# Altium PCB PCB-MAIN.PcbDoc (part 4 of 6)
Units mm, origin at the board's own origin, x right, y up, seen from the top; angles counter-clockwise.
Board outline 110 x 75 mm, 8 copper layers (F.Cu, In1.Cu, In2.Cu, In3.Cu, In4.Cu, In5.Cu, In6.Cu, B.Cu); 251 components, 185 nets, 1143 pads, 853 vias.
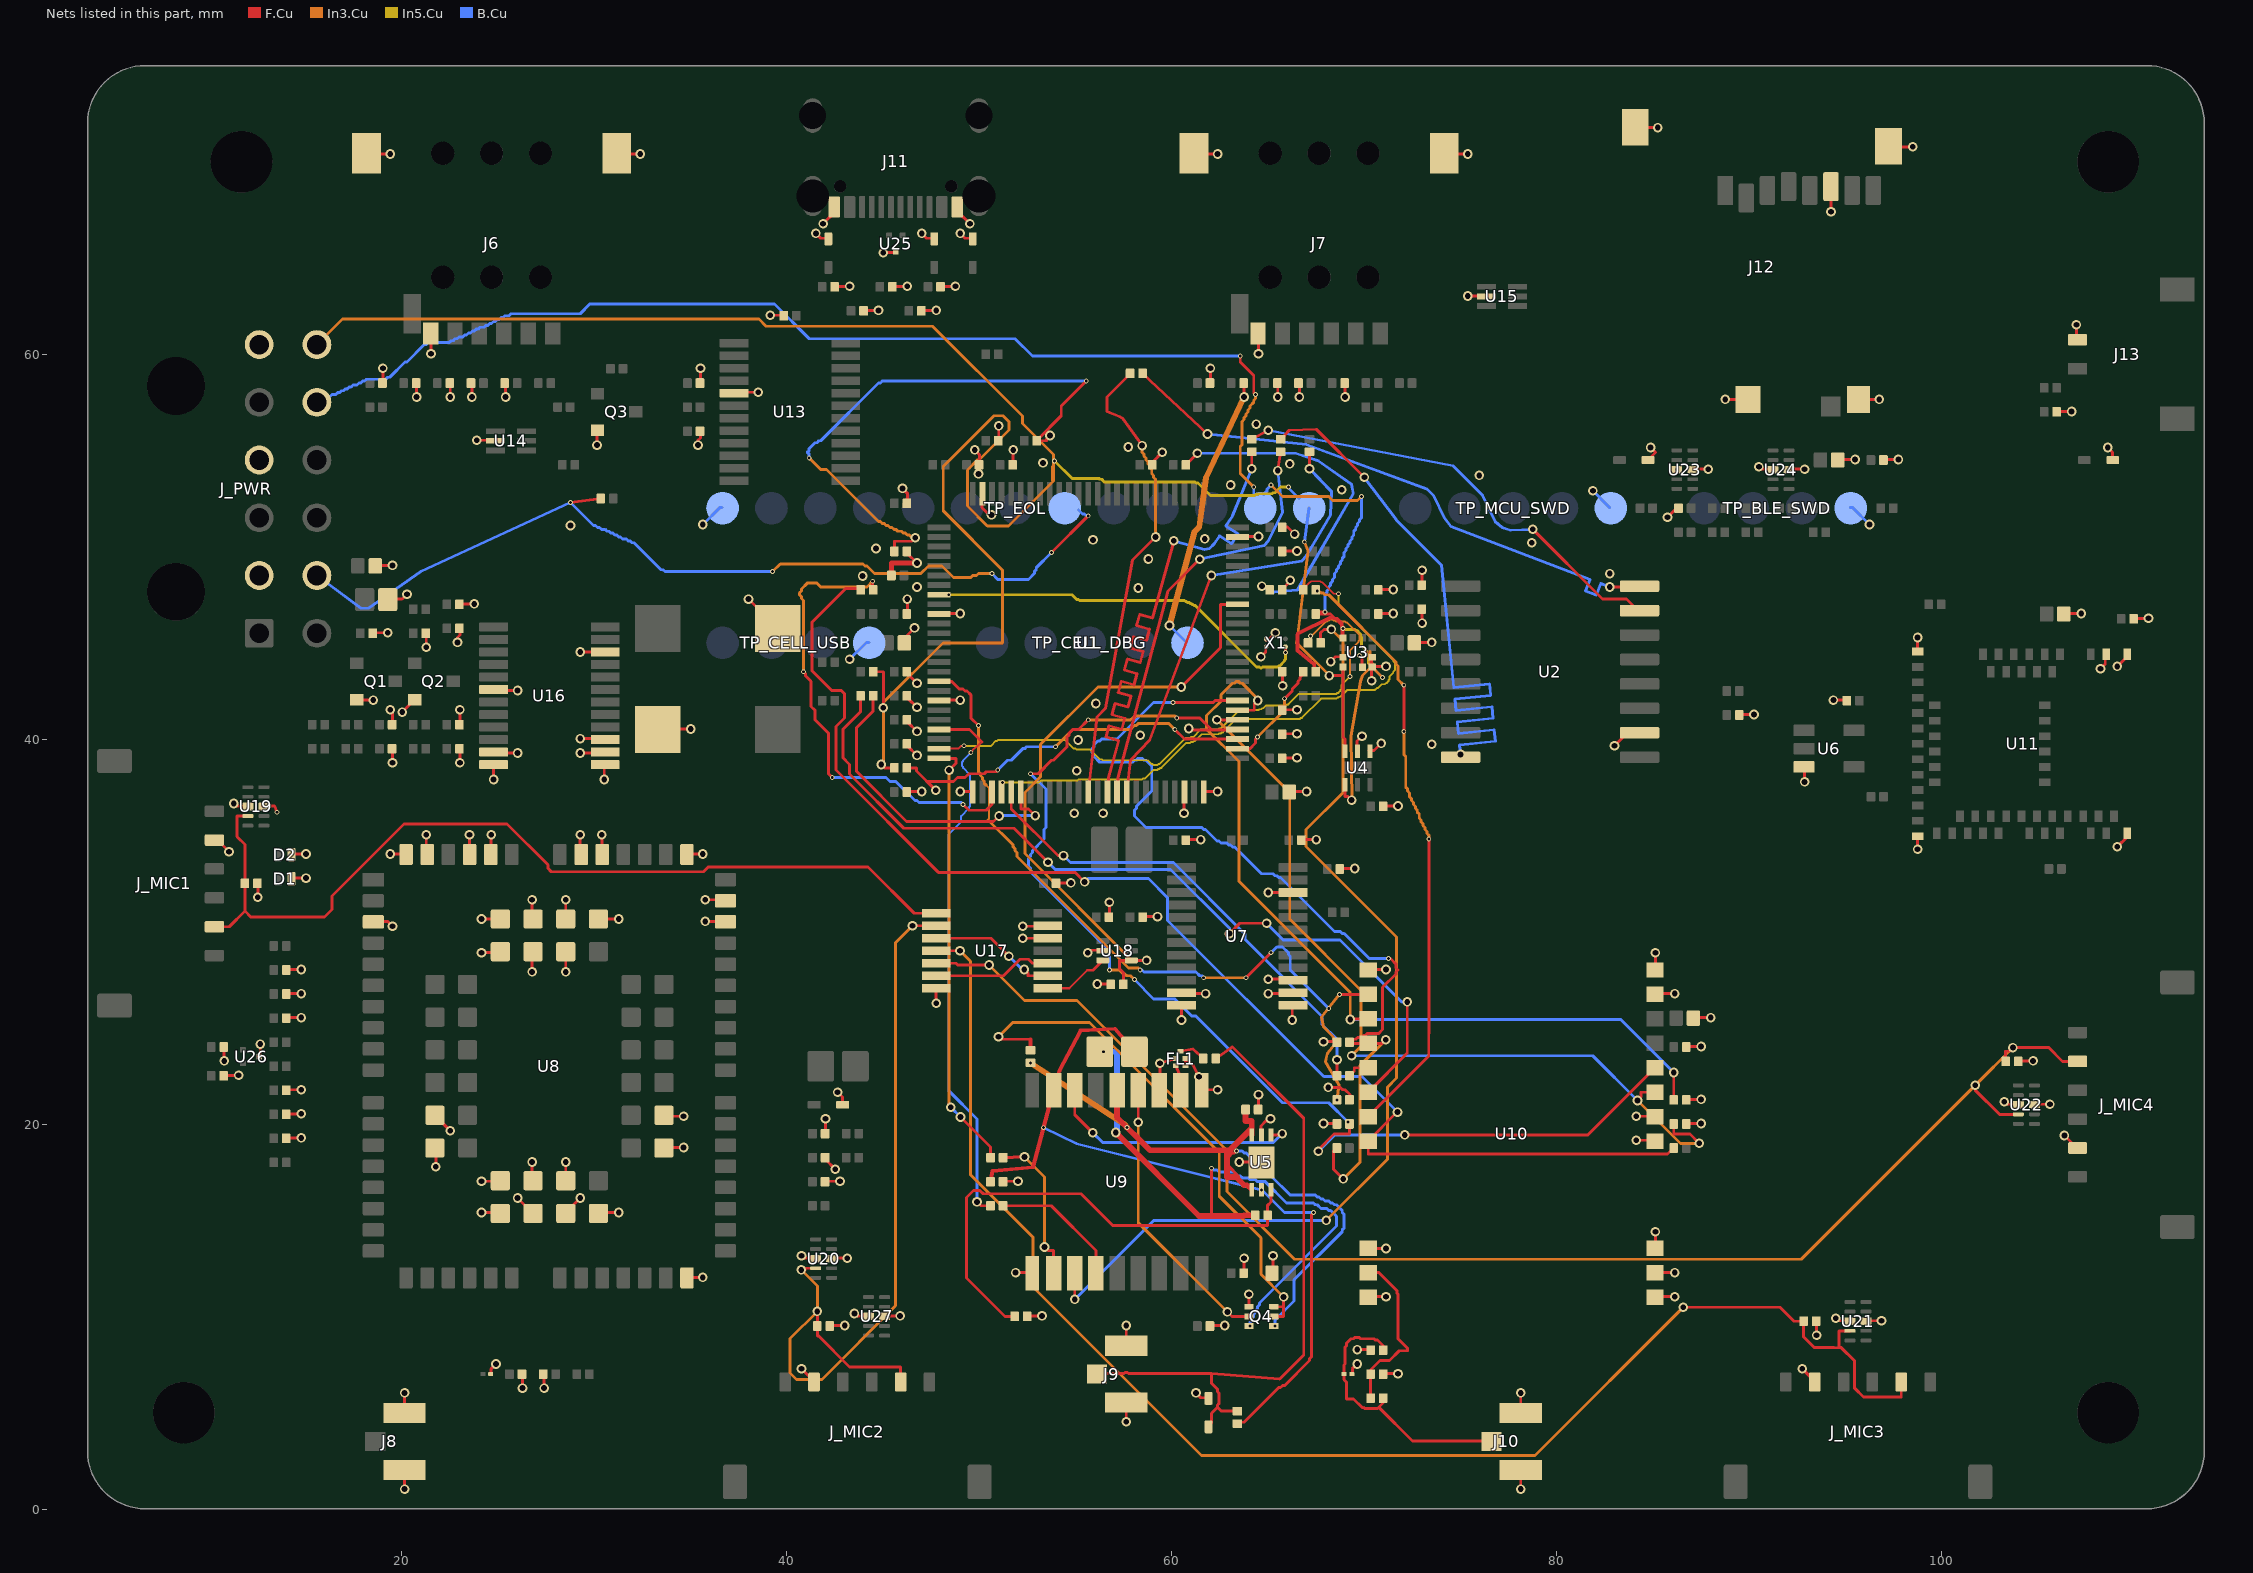
[diagram p9: the nets of this part, all layers, seen from the top]

## Via types
v1: diameter 0.5, hole 0.3, F.Cu to B.Cu, tented both sides, 579 vias
v2: diameter 0.25, hole 0.15, F.Cu to B.Cu, tented both sides, 274 vias

## Nets (pads, with @x,y where several pads share a name; then routed paths per layer and width w, separated by ;. In a path a pad name is that pad's centre, name@x,y a point inside that pad or via, vN(x,y) a via of type N, cw(c..) or ccw(c..) an arc to the next point about the centre after c; other vN are vias at no path point) (continued)
FAULT: J_PWR.8 R103.1 TP_EOL.8 | length 48.2
  F.Cu w0.15: v2(28.785,52.325) R103.1@30.36,52.525 ; v2(53.785,49.725) v2(55.685,51.625)
  In3.Cu w0.15: v2(39.285,48.725) 39.685,49.125 43.985,49.125 44.085,49.025 44.185,49.025 44.585,48.625 46.985,48.625 47.385,49.025 48.085,49.025 48.685,48.425 49.585,48.425 49.685,48.525 49.885,48.525 49.985,48.625 v2(50.685,48.625)
  B.Cu w0.15: J_PWR.8@15.605,48.525 17.885,46.825 18.285,46.825 20.985,48.725 v2(28.785,52.325) 29.985,51.125 30.085,51.125 30.185,51.025 30.285,51.025 30.385,50.925 30.585,50.925 30.685,50.825 30.785,50.825 30.885,50.725 30.985,50.725 31.085,50.625 31.185,50.625 31.285,50.525 31.385,50.525 31.485,50.425 31.685,50.425 31.785,50.325 31.885,50.325 31.985,50.225 32.085,50.225 33.485,48.825 33.585,48.825 33.685,48.725 v2(39.285,48.725) ; v2(50.685,48.625) 50.985,48.325 52.585,48.325 52.885,48.625 52.885,48.725 52.985,48.825 52.985,48.925 v2(53.785,49.725) ; TP_EOL.8@55.185,51.925 55.385,51.725 55.485,51.725 55.585,51.625 v2(55.685,51.625)
GND_DIGITAL: C1.2 C2.2 C3.2 C4.2 C5.2 C6.2 C7.2 C8.2 C9.2 C10.2 C11.2 C12.2 C13.2 C14.2 C15.2 C16.2 C17.2 C18.2 C19.2 C21.2 C22.2 C23.2 C24.2 C25.2 C26.2 C27.2 C28.2 C29.2 C31.2 C32.2 C60.2 C61.2 C62.2 C63.2 C65.2 C66.2 C67.2 C68.2 C69.2 C70.2 C71.2 C72.2 C73.2 C74.2 C75.2 C76.2 C77.2 C78.2 D4.2 D5.2 D6.2 D7.2 D8.2 D9.2 D11.2 FL1.B FL1.D FL1.E J9.SHIELD J10.SHIELD J11.A1 J11.A12 J11.B1 J11.B12 J12.6 J12.SHIELD J13.2 J_PWR.4 Q4.1 R2.2 R3.2 R5.2 R23.2 R60.2 R63.2 R64.2 R65.2 R66.2 R77.2 R93.2 R94.2 R96.2 R97.2 R98.2 TP_BLE_SWD.4 TP_EOL.1 TP_MCU_SWD.5 U1.10 U1.19 U1.26 U1.48 U1.50 U1.74 U1.99 U2.10 U3.3 U3.6 U3.7 U3.8 U4.4 U4.5 U5.5 U5.EP U6.3 U7.11 U7.12 U7.13 U7.14 U7.15 U7.22 U9.1 U9.10 U9.12 U10.1 U10.2 U10.3 U10.4 U10.5 U10.10 U10.11 U10.12 U10.20 U10.22 U11.1 U11.2 U11.15 U11.33 U11.55 U18.2 U23.3 U23.8 U24.3 U24.8 U25.3 X1.1 X1.4 | length 121.2
  F.Cu w0.15: C19.2@19.285,47.3 20.035,47.3 v1(20.285,47.55) ; v1(41.535,66.3) 41.785,66.05 D8.2@42.16,66.05 ; v1(41.91,66.8) 42.535,67.425 J11.B1@42.535,67.675 ; R94.2@42.535,63.55 v1(43.285,63.55) ; R98.2@44.035,62.3 v1(44.785,62.3) ; v1(45.035,65.3) U25.3@45.66,65.3 ; C77.2@45.535,63.55 v1(46.285,63.55) ; v1(46.035,53.05) 46.285,52.8 R96.2@46.285,52.3 ; C6.2@46.16,45.05 46.16,45.3 v1(46.66,45.8) ; C2.2@46.285,37.3 v1(47.035,37.3) ; C10.2@46.285,39.8 46.285,39.675 v1(46.785,39.175) ; C8.2@46.285,41.05 46.285,40.925 v1(46.785,40.425) ; C9.2@46.285,42.3 46.285,42.175 v1(46.785,41.675) ; C11.2@46.285,43.55 46.285,43.425 v1(46.785,42.925) ; C1.2@46.285,46.55 v1(46.285,47.3) ; R5.2@46.285,49.8 46.285,49.675 v1(46.785,49.175) ; R97.2@47.035,62.3 v1(47.785,62.3) ; v1(47.035,66.3) 47.285,66.05 D7.2@47.66,66.05 ; U1.19@47.91,42.05 v1(49.035,42.05) ; U1.10@47.91,46.55 v1(49.035,46.55) ; R93.2@48.035,63.55 v1(48.785,63.55) ; J11.B12@48.91,67.675 48.91,67.425 v1(49.535,66.8) ; v1(49.035,37.3) U1.26@49.66,37.3 ; v1(49.035,66.3) 49.285,66.05 D6.2@49.66,66.05 ; v1(49.785,55.05) 50.035,54.8 C5.2@50.035,54.3 ; U1.99@50.16,52.8 50.16,52.05 50.41,51.8 50.535,51.8 v1(50.66,51.675) ; C17.2@51.035,55.55 v1(51.035,56.3) ; C63.2@51.285,17.05 v1(52.035,17.05) ; C15.2@51.785,54.3 v1(51.785,55.05) ; v1(51.91,12.3) U9.1@52.785,12.3 ; R60.2@52.535,10.05 v1(53.285,10.05) ; v1(55.66,28.925) 55.785,29.05 U18.2@56.41,29.05 ; v1(56.16,27.3) R23.2@56.91,27.3 ; C31.2@56.785,30.8 v1(56.785,31.55) ; v1(57.66,4.55) J9.SHIELD@57.66,5.55 ; J9.SHIELD@57.66,8.55 v1(57.66,9.55) ; C32.2@58.535,30.8 v1(59.285,30.8) ; C18.2@59.035,54.3 59.035,54.425 v1(59.535,54.925) ; U9.12@59.41,21.8 v1(59.41,23.175) FL1.B@60.235,23.425 ; v1(60.535,25.425) U7.12@60.535,26.175 ; U7.11@60.535,26.8 v1(61.785,26.8) ; v1(60.66,36.175) U1.48@60.66,37.3 ; FL1.E@60.735,23.05 FL1.D@60.735,23.425 61.135,23.075 v1(61.435,22.475) ; C27.2@60.785,34.8 v1(61.535,34.8) ; v1(61.285,6.05) 61.535,5.8 D4.2@61.91,5.8 ; U9.10@61.535,21.8 v1(62.41,21.8) ; U1.50@61.66,37.3 v1(62.41,37.3) ; C62.2@62.035,9.55 v1(62.785,9.55) ; U1.74@63.41,50.55 v1(64.535,50.55) ; v1(63.535,18.05) U5.EP@64.66,18.05 ; C60.2@63.785,12.3 v1(63.785,13.05) ; Q4.1@64.035,10.55 v1(64.035,11.175) ; C65.2@64.535,20.8 v1(64.535,21.55) ; U5.5@64.66,19.425 64.66,19.925 64.91,20.175 65.035,20.175 v1(65.16,20.3) ; v1(64.66,44.3) 64.91,44.55 X1.1@64.91,44.8 ; X1.4@64.91,45.175 65.035,45.175 v1(65.41,45.55) ; v1(65.035,26.8) U7.14@66.285,26.8 ; v1(65.035,27.55) U7.15@66.285,27.55 ; v1(65.035,32.05) U7.22@66.285,32.05 ; C61.2@65.285,12.3 v1(65.285,13.175) ; C3.2@65.785,39.05 v1(66.535,39.05) ; C14.2@65.785,40.3 v1(66.535,40.3) ; C16.2@65.785,41.55 v1(66.535,41.55) ; v1(65.785,42.8) R2.2@65.785,43.55 ; R3.2@65.785,47.8 v1(66.185,48.275) ; C12.2@65.785,49.8 v1(66.535,49.8) ; C4.2@65.785,51.05 66.035,51.05 v1(66.41,50.675) ; C13.2@66.16,37.3 v1(67.035,37.3) ; v1(66.285,25.425) U7.13@66.285,26.175 ; C28.2@66.785,34.8 v1(67.535,34.8) ; v1(67.91,20.05) R63.2@68.66,20.05 ; v1(67.91,24.3) C68.2@68.66,24.3 ; v1(68.16,21.925) 68.785,21.925 68.91,21.8 69.035,21.8 69.285,21.55 R65.2@69.285,21.3 ; v1(68.285,44.05) 68.535,44.3 U3.3@68.91,44.3 ; C29.2@68.785,33.3 v1(69.535,33.3) ; D5.2@69.41,7.05 69.41,7.3 v1(69.66,7.55) ; v1(69.66,8.3) C70.2@70.41,8.3 ; U4.5@69.66,39.425 69.66,39.925 v1(69.91,40.175) ; v2(69.785,44.375) 69.91,44.3 U3.6@69.91,43.8 ; U10.22@70.285,11.05 v1(71.16,11.05) ; U10.20@70.285,13.55 v1(71.16,13.55) ; U10.12@70.285,28.05 v1(71.16,28.05) ; U4.4@70.285,39.425 70.535,39.425 v1(70.91,39.8) ; v1(70.41,43.05) U3.8@70.41,44.3 ; U3.7@70.41,43.8 v1(71.16,43.8) ; C23.2@70.785,46.55 v1(71.535,46.55) ; C25.2@70.785,47.8 v1(71.535,47.8) ; C69.2@71.035,7.05 v1(71.785,7.05) ; C26.2@71.035,36.55 v1(71.785,36.55) ; C24.2@72.66,45.05 v1(73.535,45.05) ; v1(73.035,46.05) C21.2@73.035,46.8 ; C22.2@73.035,48.05 v1(73.035,48.8) ; v1(78.16,1.05) J10.SHIELD@78.16,2.05 ; J10.SHIELD@78.16,5.05 v1(78.16,6.05) ; v1(83.035,39.675) 83.66,40.3 U2.10@84.285,40.3 ; v1(84.16,19.175) U10.4@85.16,19.175 ; v1(84.16,20.425) U10.5@85.16,20.425 ; J12.SHIELD@84.16,71.8 v1(85.285,71.8) ; D11.2@84.775,54.525 85.16,54.925 v1(84.91,55.175) ; U10.1@85.16,11.05 v1(86.16,11.05) ; U10.2@85.16,12.3 v1(86.16,12.3) ; U10.3@85.16,13.55 v1(85.16,14.425) ; U10.10@85.16,26.8 v1(86.16,26.8) ; U10.11@85.16,28.05 v1(85.16,28.925) ; v1(85.785,51.55) 86.285,52.05 C76.2@86.41,52.05 ; R64.2@86.785,20.05 v1(87.535,20.05) ; R66.2@86.785,21.3 v1(87.535,21.3) ; C66.2@86.785,24.05 v1(87.535,24.05) ; C67.2@87.16,25.55 v1(88.035,25.55) ; U23.8@87.16,54.05 v1(87.91,54.05) ; v1(88.785,57.675) J12.SHIELD@89.91,57.675 ; R77.2@89.535,41.3 v1(90.285,41.3) ; v1(90.535,54.175) 90.66,54.05 U24.3@91.285,54.05 ; U24.8@92.16,54.05 v1(92.91,54.05) ; v1(92.91,37.8) U6.3@92.91,38.55 ; v1(94.285,67.425) J12.6@94.285,68.675 ; v1(94.41,42.05) C73.2@95.16,42.05 ; C75.2@94.66,54.55 v1(95.535,54.55) ; J12.SHIELD@95.66,57.675 v1(96.785,57.675) ; C74.2@97.035,54.55 v1(97.785,54.55) ; J12.SHIELD@97.285,70.8 v1(98.535,70.8) ; v1(98.785,34.3) U11.33@98.785,34.925 ; U11.15@98.785,44.55 v1(98.785,45.3) ; C78.2@106.035,57.05 v1(106.785,57.05) ; C72.2@106.41,46.55 v1(107.285,46.55) ; J13.2@107.035,60.8 v1(107.035,61.55) ; v1(108.285,43.675) 108.535,43.925 U11.2@108.535,44.425 ; v1(108.66,55.175) 108.91,54.925 D9.2@108.91,54.55 ; v1(109.16,34.425) 109.66,34.925 U11.55@109.66,35.175 ; v1(109.16,43.8) 109.66,44.3 U11.1@109.66,44.425 ; C71.2@110.035,46.3 v1(110.785,46.3)
  F.Cu w0.25: C7.2@45.46,48.525 45.46,49.175 v1(46.785,49.175)
  B.Cu w0.15: v1(35.66,51.175) 36.535,52.05 TP_EOL.1@36.66,52.05 ; v1(81.91,52.925) TP_MCU_SWD.5@82.785,52.05 ; TP_BLE_SWD.4@95.285,52.05 95.41,52.05 v1(96.285,51.175)
  other v1: 54.96,36.175 56.46,36.175 55.085,38.375 73.535,39.75 55.16,39.975 58.385,40.225 56.085,41.875 58.285,47.875 46.785,47.925 43.96,48.5 82.785,48.625 58.814,49.384 44.66,49.925 78.735,50.225 55.935,50.375 61.735,50.425 28.785,51.125 68.86,52.975 63.085,53.225 76.001,53.725 49.985,53.805 66.16,54.325 53.335,54.375 57.76,55.2 64.411,56.392
  other v2: 86.267,54.025
GND_MIC: C20.2 C30.2 J_MIC1.2 J_MIC2.2 J_MIC3.2 J_MIC4.2 J_PWR.6 R19.2 R20.2 R21.2 R22.2 U17.7 U17.12 U17.13 U19.3 U19.8 U20.3 U20.8 U21.3 U21.8 U22.3 U22.8 | length 17.8
  F.Cu w0.15: J_MIC1.2@10.285,34.8 10.41,34.8 v1(11.035,34.175) ; v1(11.285,36.675) 11.41,36.55 U19.3@12.035,36.55 ; v1(12.535,31.8) R19.2@12.535,32.55 ; U19.8@12.91,36.55 13.41,36.55 v2(13.535,36.225) ; C20.2@18.66,49.05 v1(19.535,49.05) ; v1(40.785,7.3) J_MIC2.2@41.41,6.675 ; v1(40.785,13.175) 40.91,13.05 U20.3@41.535,13.05 ; R20.2@42.285,9.55 v1(43.035,9.55) ; U20.8@42.41,13.05 v1(43.16,13.05) ; v1(47.785,26.3) U17.7@47.785,27.05 ; v1(52.285,29.675) U17.12@53.535,29.675 ; v1(52.285,30.3) U17.13@53.535,30.3 ; C30.2@54.035,32.55 v1(54.785,32.55) ; v1(92.785,7.3) J_MIC3.2@93.41,6.675 ; v1(93.535,9.05) R21.2@93.535,9.8 ; v1(94.535,9.925) 94.66,9.8 U21.3@95.285,9.8 ; U21.8@96.16,9.8 v1(96.91,9.8) ; v1(103.285,21.175) 103.41,21.05 U22.3@104.035,21.05 ; R22.2@104.035,23.3 v1(104.785,23.3) ; U22.8@104.91,21.05 v1(105.66,21.05) ; v1(106.41,19.425) J_MIC4.2@107.035,18.8
GND_MODEM: C33.2 C34.2 C35.2 C36.2 C37.2 C38.2 C39.2 C40.2 C41.2 C42.2 C43.2 C44.2 C45.2 C46.2 C47.2 C48.2 C49.2 C50.2 C51.2 C52.2 C53.2 C54.2 C55.2 C56.2 C57.2 C58.2 C59.2 C79.2 C80.2 D1.2 D2.2 D3.2 D10.2 J6.4 J6.SHIELD J7.4 J7.SHIELD J8.SHIELD J_PWR.2 Q1.2 Q2.2 Q3.2 R25.2 R27.2 R29.2 R34.2 R35.2 R45.2 R47.2 TP_CELL_DBG.5 TP_CELL_USB.4 U8.3 U8.31 U8.47 U8.48 U8.50 U8.54 U8.55 U8.58 U8.59 U8.61 U8.62 U8.67 U8.68 U8.69 U8.70 U8.71 U8.72 U8.73 U8.74 U8.79 U8.80 U8.81 U8.82 U8.89 U8.90 U8.91 U8.100 U8.101 U8.102 U13.5 U14.2 U15.2 U16.6 U16.11 U16.12 U16.13 U16.14 U16.15 U16.22 U26.3 U27.3 U27.8 | length 101.3
  F.Cu w0.15: C37.2@10.785,22.55 v1(11.535,22.55) ; v1(10.785,23.3) C38.2@10.785,24.05 ; U26.3@12.66,23.55 v1(12.66,24.175) ; C45.2@14.035,19.3 v1(14.785,19.3) ; C41.2@14.035,20.55 v1(14.785,20.55) ; C39.2@14.035,21.8 v1(14.785,21.8) ; C40.2@14.035,25.55 v1(14.785,25.55) ; C43.2@14.035,26.8 v1(14.785,26.8) ; C47.2@14.035,28.05 v1(14.785,28.05) ; D1.2@14.285,32.8 v1(15.035,32.8) ; D2.2@14.285,34.05 v1(15.035,34.05) ; Q1.2@17.66,42.05 v1(18.535,42.05) ; J6.SHIELD@18.16,70.425 v1(19.41,70.425) ; U8.3@18.535,30.55 19.285,30.55 v1(19.535,30.3) ; R25.2@18.535,45.55 v1(19.285,45.55) ; C50.2@19.035,58.55 v1(19.035,59.3) ; v1(19.41,34.05) U8.62@20.285,34.05 ; v1(19.41,41.55) 19.535,41.425 R27.2@19.535,40.8 ; v1(19.535,38.8) R34.2@19.535,39.55 ; v1(20.035,41.425) Q2.2@20.66,42.05 ; v1(20.16,1.05) J8.SHIELD@20.16,2.05 ; J8.SHIELD@20.16,5.05 v1(20.16,6.05) ; v1(20.785,57.8) C52.2@20.785,58.55 ; U8.61@21.285,34.05 v1(21.285,35.05) ; v1(21.285,44.8) R29.2@21.285,45.55 ; v1(21.535,60.05) J6.4@21.535,61.05 ; v1(21.785,17.8) U8.68@21.785,18.8 ; U8.67@21.785,20.425 v1(22.535,19.675) ; v1(22.535,57.8) C54.2@22.535,58.55 ; v1(22.91,45.05) 22.91,45.3 23.035,45.425 C33.2@23.035,45.8 ; v1(23.035,38.8) C48.2@23.035,39.55 ; C35.2@23.035,40.8 v1(23.035,41.55) ; C34.2@23.035,47.05 v1(23.785,47.05) ; U8.59@23.535,34.05 v1(23.535,35.05) ; v1(23.66,57.8) C55.2@23.66,58.55 ; v1(23.91,55.55) U14.2@24.91,55.55 ; v1(24.16,15.425) U8.69@25.16,15.425 ; v1(24.16,17.05) U8.89@25.16,17.05 ; v1(24.16,28.925) U8.102@25.16,28.925 ; v1(24.16,30.675) U8.82@25.16,30.675 ; D3.2@24.66,7.05 24.66,7.3 v1(24.91,7.55) ; U8.58@24.66,34.05 v1(24.66,35.05) ; v1(24.785,37.925) U16.12@24.785,38.675 ; U16.11@24.785,39.3 v1(26.035,39.3) ; U16.6@24.785,42.55 v1(26.035,42.55) ; v1(25.41,57.8) C56.2@25.41,58.55 ; v1(26.035,16.175) U8.70@26.785,15.425 ; v1(26.285,6.3) C80.2@26.285,7.05 ; U8.90@26.785,17.05 v1(26.785,18.05) ; v1(26.785,27.925) U8.101@26.785,28.925 ; U8.81@26.785,30.675 v1(26.785,31.675) ; v1(27.41,6.3) C79.2@27.41,7.05 ; U8.71@28.535,15.425 v1(29.285,16.175) ; U8.91@28.535,17.05 v1(28.535,18.05) ; v1(28.535,27.925) U8.100@28.535,28.925 ; U8.80@28.535,30.675 v1(28.535,31.675) ; U8.55@29.285,34.05 v1(29.285,35.05) ; v1(29.285,39.3) U16.14@30.535,39.3 ; v1(29.285,40.05) U16.15@30.535,40.05 ; v1(29.285,44.55) U16.22@30.535,44.55 ; v1(30.16,55.3) Q3.2@30.16,56.05 ; U8.72@30.285,15.425 v1(31.285,15.425) ; U8.79@30.285,30.675 v1(31.285,30.675) ; U8.54@30.41,34.05 v1(30.41,35.05) ; v1(30.535,37.925) U16.13@30.535,38.675 ; J6.SHIELD@31.16,70.425 v1(32.41,70.425) ; C36.2@33.285,40.55 v1(35.035,40.55) ; U8.73@33.66,18.8 v1(34.66,18.8) ; U8.74@33.66,20.425 v1(34.66,20.425) ; U8.31@34.785,12.05 v1(35.66,12.05) ; U8.50@34.785,34.05 v1(35.66,34.05) ; v1(35.41,55.3) 35.41,55.55 35.535,55.675 C49.2@35.535,56.05 ; R47.2@35.535,58.55 v1(35.535,59.3) ; v1(35.785,30.55) U8.47@36.785,30.55 ; v1(35.785,31.675) U8.48@36.785,31.675 ; U13.5@37.285,58.05 v1(38.535,58.05) ; v1(38.035,47.3) C44.2@39.535,45.8 ; v1(39.16,62.05) R45.2@39.91,62.05 ; R35.2@42.035,17.05 v1(42.785,17.05) ; C46.2@42.035,18.3 42.035,18.175 v1(42.535,17.675) ; C42.2@42.035,19.55 v1(42.035,20.3) ; v1(42.66,21.675) 42.91,21.425 D10.2@42.91,21.05 ; v1(43.535,10.175) 43.66,10.05 U27.3@44.285,10.05 ; U27.8@45.16,10.05 v1(45.91,10.05) ; J7.SHIELD@61.16,70.425 v1(62.41,70.425) ; C51.2@62.035,58.55 v1(62.035,59.3) ; v1(63.785,57.8) C53.2@63.785,58.55 ; v1(64.535,60.05) J7.4@64.535,61.05 ; v1(65.535,57.8) C57.2@65.535,58.55 ; v1(66.66,57.8) C58.2@66.66,58.55 ; v1(69.035,57.8) C59.2@69.035,58.55 ; J7.SHIELD@74.16,70.425 v1(75.41,70.425) ; v1(75.41,63.05) U15.2@76.41,63.05
  In3.Cu w0.3: v1(59.91,45.925) 61.21,50.8 61.46,51.05 61.81,53.6 v1(63.785,57.8)
  B.Cu w0.15: v1(43.285,44.175) 44.16,45.05 TP_CELL_USB.4@44.285,45.05 ; v1(59.91,45.925) TP_CELL_DBG.5@60.785,45.05
GNSS_ANT_BIAS_RAW: C65.1 Q4.4 R61.1 U5.3 U5.4 U9.14 | length 36.6
  F.Cu w0.15: v2(63.385,18.625) 63.285,18.525 63.185,18.525 62.985,18.325 62.985,17.825 63.485,17.325 63.485,17.225 63.585,17.125 63.585,17.025
  F.Cu w0.25: 63.784,16.85 63.935,16.85 U5.3@64.185,16.6
  F.Cu w0.3: U9.14@57.185,21.775 57.185,20.523 57.185,20.359 58.89,18.654 62.892,18.654 ; 63.784,16.85 63.359,17.275 62.892,17.275 62.892,18.654 ; C65.1@63.86,20.775 63.86,20.173 64.164,20.173 64.185,20.152 64.185,19.801 ; U5.4@64.185,19.45 64.185,19.801 ; 62.892,18.654 63.038,18.654 64.185,19.801
  In3.Cu w0.3: v2(52.685,23.2) 57.585,20 v2(57.702,19.842)
  B.Cu w0.15: v2(63.385,18.625) 63.685,18.625 63.785,18.525 63.885,18.525 65.085,17.325 65.185,17.325 66.185,16.325 67.485,16.325 67.585,16.225 67.685,16.225 67.785,16.125 67.885,16.125 67.985,16.025 68.185,16.025 68.285,15.925 68.385,15.925 68.485,15.825 68.585,15.825 68.885,15.525 68.885,15.425 68.985,15.325 68.985,14.625 68.885,14.525 68.885,14.425 66.385,11.925 66.385,10.825 65.385,9.825 v2(65.385,9.525)
GNSS_ANT_DETECT: U5.6 U9.16 | length 13.5
  F.Cu w0.15: U9.16@54.985,21.775 54.985,20.504 v1(55.924,19.565) ; U5.6@65.185,19.45 65.695,19.45 v1(65.769,19.524)
  B.Cu w0.15: v1(55.924,19.565) 56.435,19.053 65.298,19.053 v1(65.769,19.524)
GNSS_ANT_DIV: R59.2 R60.1 U5.1 | length 26
  F.Cu w0.15: R60.1@51.86,10.025 51.358,10.025 49.364,12.019 49.364,16.206 49.73,16.572 50.053,16.572 50.226,16.4 55.308,16.4 56.96,14.748 65.01,14.748 R59.2@65.01,15.275 65.01,15.802 65.181,15.973 65.185,15.973 U5.1@65.185,16.6
GNSS_ANT_GATE: Q4.5 Q4.6 R61.2 | length 28.3
  F.Cu w0.15: v1(51.025,24.556) 51.156,24.425 51.207,24.425 52.685,24.425 ; Q4.5@65.323,10.025 65.839,10.025 65.839,10.525 ; v1(65.839,11.039) 65.839,10.525 ; 65.839,10.525 Q4.6@65.323,10.525 65.839,10.525
  F.Cu w0.2: R61.2@52.685,23.85 52.685,24.425
  In3.Cu w0.15: v1(51.025,24.556) 51.761,25.292 55.75,25.292 62.497,18.546 62.497,16.271 64.659,14.108 64.659,12.219 v1(65.839,11.039)
GNSS_ANT_OFF_N: Q4.2 U9.13 | length 14.7
  F.Cu w0.15: v1(58.285,20.113) U9.13@58.285,21.775 ; v1(62.919,10.259) 63.153,10.025 Q4.2@64.047,10.025
  In3.Cu w0.15: v1(58.285,20.113) 58.285,14.893 v1(62.919,10.259)
GNSS_ANT_SHORT_N: C63.1 L2.1 R62.2 U5.2 U9.17 | length 41.3
  F.Cu w0.15: L2.1@63.585,4.525 63.785,4.525 65.585,6.325 65.685,6.325 65.785,6.425 65.885,6.425 67.185,7.725 67.185,7.825 67.285,7.925 67.285,15.325 v2(67.385,15.425)
  F.Cu w0.2: C63.1@50.61,17.025 50.71,17.575 52.81,17.775 U9.17@53.885,21.775 54.185,22.775 55.285,24.875 57.085,24.975 R62.2@58.085,23.775
  B.Cu w0.15: v2(53.363,19.831) 55.085,19 v2(64.685,16.6) ; v2@64.685,16.625 65.885,15.425 v2(67.385,15.425)
GNSS_ANT_SWITCHED: Q4.3 R59.1 R62.1 | length 31.6
  F.Cu w0.15: 62.085,15.225 v2(62.085,17.725)
  F.Cu w0.3: v1(57.113,19.58) 61.447,15.246 63.754,15.246 63.783,15.275 R59.1@64.36,15.275
  B.Cu w0.15: v2(62.085,17.725) 62.185,17.625 62.385,17.625 62.485,17.525 63.285,17.525 63.485,17.325 63.585,17.325 63.685,17.225 63.985,17.225 64.085,17.125 64.385,17.125 64.485,17.025 64.885,17.025 65.985,15.925 67.385,15.925 67.485,15.825 67.585,15.825 67.785,15.625 68.085,15.625 68.185,15.525 68.285,15.525 68.585,15.225 68.585,14.725 64.585,10.725 64.585,10.625 64.485,10.525 64.485,10.425 64.385,10.325 64.385,10.225 64.285,10.125 64.285,10.025 64.185,9.925 64.185,9.825 64.085,9.725 v2(64.085,9.525)
  B.Cu w0.3: v2(56.485,23.775) 57.185,23.775 57.185,19.652 v1(57.113,19.58)
GNSS_PPS_U1: R58.2 U1.22 | length 28.8
  F.Cu w0.1: v2(49.585,39.325) 49.685,39.425 49.685,39.475 50.17,39.875
  F.Cu w0.15: U1.22@47.935,40.525 49.52,40.525 50.17,39.875 ; v1(49.907,15.974) 49.909,15.974 50.108,15.775 R58.2@50.61,15.775
  B.Cu w0.1: 48.485,35.125 49.085,35.725 49.085,36.025 49.485,36.425 49.485,36.475 49.535,36.525 49.535,38.175 49.185,38.525 49.185,38.575 49.135,38.625 49.135,38.825 49.185,38.875 49.185,38.925 v2(49.585,39.325)
  B.Cu w0.15: 48.438,35.078 48.438,21.751 49.907,20.282 v1(49.907,15.974)
GNSS_PPS_U9: R58.1 U9.4 | length 7
  F.Cu w0.15: R58.1@51.26,15.775 51.762,15.775 53.762,15.775 56.085,13.452 U9.4@56.085,12.275
GNSS_RF_ANT_BIASED: C64.1 D4.1 J9.1 L2.2 | length 34.1
  F.Cu w0.151: J9.1@56.16,7.05 57.535,7.05 57.597,7.113 57.722,7.113 57.785,7.05 62.097,7.05 ; D4.1@61.91,4.3 62.097,4.488 62.097,4.988 62.41,5.3 ; C64.1@62.31,23.425 63.185,24.025 66.885,20.325 66.885,8.025 65.635,6.775 62.097,7.05 ; L2.2@63.41,5.113 62.597,5.113 62.41,5.3 ; 62.097,7.05 62.097,6.55 62.41,6.238 62.41,6.112 62.472,6.05 62.472,5.487 62.41,5.425 62.41,5.3
GNSS_RF_DC_BLOCK: C64.2 FL1.C | length 1.4
  F.Cu w0.151: FL1.C@60.485,23.8 61.135,23.925 C64.2@61.66,23.425
GNSS_RF_FILTERED: FL1.A U9.11 | length 1.3
  F.Cu w0.151: FL1.A@60.235,23.05 60.485,22.475 U9.11@60.485,21.775
GNSS_RX_U1: R56.2 U1.25 | length 22.7
  F.Cu w0.15: U1.25@47.935,39.025 48.812,39.025 48.812,38.768 v1@48.458,38.414 ; v1(49.046,20.389) 50.61,18.825 R56.2@50.61,18.275
  In3.Cu w0.15: v1(48.456,38.414) 48.456,20.978 v1(48.542,20.893)
  B.Cu w0.15: v1(48.542,20.893) v1(49.046,20.389)
GNSS_RX_U9: R56.1 U9.2 | length 8
  F.Cu w0.15: R56.1@51.26,18.275 51.762,18.275 51.798,18.311 v1(52.374,18.311) ; v1(53.413,13.629) 53.59,13.452 53.885,13.452 U9.2@53.885,12.275
  In3.Cu w0.15: v1(52.374,18.311) 53.413,17.272 v1(53.413,13.629)
GNSS_TX_U1: R57.1 U1.24 | length 29.6
  F.Cu w0.1: U1.24@48.385,39.525 48.935,39.525 49.085,39.675 v2(49.235,39.675) ; R57.1@67.135,45.125 67.185,45.175 67.185,45.225 67.235,45.275 v2(67.235,45.375)
  In3.Cu w0.1: v2(67.235,45.375) 67.285,45.375 68.035,46.125 68.085,46.125 68.135,46.175 68.185,46.175 68.235,46.225 68.385,46.225 68.435,46.175 68.535,46.175 68.585,46.125 69.035,46.125 69.085,46.075 69.135,46.075 69.785,45.425 69.785,45.175 69.735,45.125 69.735,45.075 69.285,44.625 v2(69.285,43.275)
  In5.Cu w0.1: v2(49.235,39.675) 50.635,39.675 50.885,39.925 50.935,39.925 50.985,39.975 54.485,39.975 54.935,39.525 55.035,39.525 55.085,39.475 55.785,39.475 56.285,38.975 56.385,38.975 56.435,38.925 58.785,38.925 58.985,38.725 59.035,38.725 59.085,38.675 59.285,38.675 59.335,38.725 59.385,38.725 60.735,40.075 60.985,40.075 61.035,40.125 61.135,40.125 61.535,40.525 62.435,40.525 62.485,40.575 62.585,40.575 63.535,41.525 64.535,41.525 64.585,41.575 64.685,41.575 64.735,41.625 64.785,41.625 64.935,41.775 65.985,41.775 66.035,41.825 66.085,41.825 66.635,42.375 68.585,42.375 68.635,42.425 68.685,42.425 68.785,42.525 68.785,42.575 68.835,42.625 68.835,42.825 v2(69.285,43.275)
GNSS_TX_U9: R57.2 U9.3 | length 52.5
  F.Cu w0.15: v1(54.985,10.908) U9.3@54.985,12.275 ; R57.2@67.76,45.025 67.76,45.552 67.932,45.724 v1(68.323,45.724)
  In3.Cu w0.15: v1(68.049,15.013) 71.229,18.193 71.229,21.935 71.703,22.408 71.703,29.745 67.005,34.443 67.005,35.327 68.918,37.24 68.918,45.129 v1(68.323,45.724)
  B.Cu w0.15: v1(54.985,10.908) 59.09,15.013 v1(68.049,15.013)
HW_REV0: R3.1 R4.2 | length 18
  F.Cu w0.15: R4.2@60.76,54.275 v1(61.36,54.875) ; v1(64.71,47.975) R3.1@65.11,47.775
  B.Cu w0.15: v1(61.36,54.875) 66.46,54.875 67.66,54.475 69.36,53.275 69.46,52.775 66.56,47.775 65.36,47.675 v1(64.71,47.975)
HW_REV1: R5.1 R6.2 | length 30.1
  F.Cu w0.15: R5.1@45.61,49.775 45.61,50.302 46.509,50.302 v1(46.698,50.491) ; R6.2@53.01,55.525 53.512,55.525 53.512,55.612 v1(53.701,55.801) ; R6.2@53.085,55.625 54.285,56.825 54.285,57.325 v2(55.585,58.625)
  In3.Cu w0.15: v2(41.185,54.625) 41.785,54.025 42.085,54.025 44.785,51.325 44.885,51.325 44.985,51.225 45.085,51.225 45.185,51.125 45.285,51.125 45.385,51.025 45.485,51.025 45.585,50.925 45.685,50.925 45.785,50.825 45.985,50.825 46.085,50.725 46.185,50.725 46.285,50.625 46.385,50.625 46.485,50.525 v1@46.585,50.525
  B.Cu w0.15: v2(41.185,54.625) 41.185,54.825 41.085,54.925 41.185,55.025 41.185,55.125 41.485,55.425 41.585,55.425 41.685,55.525 41.785,55.525 44.785,58.525 44.885,58.525 44.985,58.625 v2(55.585,58.625)
I2C2_SCL_BUS: J_PWR.11 R13.2 R15.2 TP_EOL.12 U3.1 U4.1 | length 93.9
  F.Cu w0.15: v2(63.585,59.925) 63.585,59.625 64.285,58.925 64.285,58.025 v2(64.385,57.925) ; R13.2@67.51,46.525 68.012,46.525 68.267,46.525 68.922,45.87 U3.1@68.922,45.275 ; R13.2@67.585,46.525 67.685,46.625 v2(67.985,46.625) ; U4.1@69.035,37.66 69.035,37.033 69.192,37.033 v1(69.37,36.855)
  F.Cu w0.2: R15.2@67.51,43.525 67.41,43.925 66.56,44.625 66.56,45.425 66.61,45.525 68.26,46.325 68.61,46.275 68.86,46.025 U3.1@68.922,45.275
  In3.Cu w0.15: v2(64.285,53.125) 63.585,53.825 63.585,55.225 63.685,55.325 63.685,56.525 63.785,56.625 63.785,56.725 63.885,56.825 63.885,56.925 63.985,57.025 63.985,57.125 64.085,57.225 64.085,57.325 64.285,57.525 64.285,57.625 64.385,57.725 v2(64.385,57.925) ; v2(65.185,53.225) 65.785,52.625 68.185,52.625 68.385,52.425 69.685,52.425 v2(69.885,52.625) ; v2(68.922,45.77) v2@68.935,45.775 ; v1(69.37,36.855) 69.385,36.875 69.335,40.175 69.835,43.025 69.935,43.325 70.335,43.725 70.335,44.575 70.335,44.075 70.485,43.925 70.485,43.725 v2(70.985,43.225)
  In5.Cu w0.15: v2@69.035,45.725 69.535,45.725 69.585,45.675 69.635,45.675 69.835,45.475 69.835,45.375 69.885,45.325 69.885,44.875 70.185,44.575 70.185,44.475 70.235,44.425 70.235,43.975 v2(70.985,43.225)
  B.Cu w0.15: J_PWR.11@16.185,57.825 16.285,57.825 16.385,57.925 16.585,57.925 16.685,58.025 16.785,58.025 16.885,58.125 16.985,58.125 17.085,58.225 17.185,58.225 17.285,58.325 17.385,58.325 17.485,58.425 17.685,58.425 17.785,58.525 17.885,58.525 17.985,58.625 18.085,58.625 18.185,58.725 19.185,58.725 19.285,58.825 19.385,58.825 20.185,59.625 20.285,59.625 21.185,60.525 21.285,60.525 21.385,60.625 22.485,60.625 22.585,60.725 22.685,60.725 22.785,60.825 22.885,60.825 22.985,60.925 23.185,60.925 23.285,61.025 23.385,61.025 23.485,61.125 23.585,61.125 23.685,61.225 23.785,61.225 23.885,61.325 23.985,61.325 24.085,61.425 24.285,61.425 24.385,61.525 24.485,61.525 24.585,61.625 24.685,61.625 24.785,61.725 24.885,61.725 24.985,61.825 25.085,61.825 25.185,61.925 25.285,61.925 25.385,62.025 25.585,62.025 25.685,62.125 29.285,62.125 29.785,62.625 39.385,62.625 41.185,60.825 51.885,60.825 52.785,59.925 v2(63.585,59.925) ; TP_EOL.12@64.285,52.725 v2(64.285,53.125) ; TP_EOL.12@64.785,52.725 64.985,52.925 64.985,53.025 v2(65.185,53.225) ; v2(67.985,46.625) 67.985,47.525 68.085,47.625 68.085,47.725 68.185,47.825 68.185,47.925 68.285,48.025 68.285,48.125 68.385,48.225 68.385,48.325 68.485,48.425 68.485,48.625 68.585,48.725 68.585,48.825 68.685,48.925 68.685,49.025 68.785,49.125 68.785,49.225 68.885,49.325 68.885,49.425 68.985,49.525 68.985,49.725 69.085,49.825 69.085,49.925 69.185,50.025 69.185,50.125 69.285,50.225 69.285,50.325 69.385,50.425 69.385,50.525 69.485,50.625 69.485,50.825 69.585,50.925 69.585,51.025 69.685,51.125 69.685,51.225 69.785,51.325 69.785,51.425 69.885,51.525 v2(69.885,52.625)
I2C2_SCL_U1: R15.1 U1.52 | length 5.2
  F.Cu w0.15: U1.52@63.885,39.525 64.085,39.525 64.385,39.825 64.385,40.025 v2(64.485,40.125) ; v2(65.885,42.125) 66.285,42.525 66.285,42.625 66.585,42.925 66.585,43.025 66.685,43.125 66.685,43.225 66.785,43.325 R15.1@66.785,43.425
  In3.Cu w0.15: v2(64.485,40.125) 65.885,41.525 v2(65.885,42.125)
I2C2_SDA_BUS: J_PWR.12 R14.2 R16.2 TP_EOL.13 U3.4 U4.6 | length 113.1
  F.Cu w0.15: R14.2@44.51,43.525 45.012,43.525 45.037,43.5 v1(45.037,41.658) ; v1(44.928,38.705) 45.108,38.525 R16.2@45.61,38.525 ; v1(68.215,43.323) 68.922,43.323 ; U3.4@68.922,43.775 68.922,43.323 ; U4.6@69.035,39.39 69.035,40.017 68.922,40.129 68.922,43.323
  In3.Cu w0.15: J_PWR.12@15.605,60.525 16.929,61.849 38.575,61.849 38.946,61.478 47.597,61.478 52.265,56.81 52.265,56.429 53.876,54.818 53.876,53.433 51.54,51.097 50.443,51.097 49.406,52.134 49.406,54.008 49.921,54.523 50.003,54.523 51.562,56.082 51.562,56.518 51.253,56.827 50.788,56.827 48.153,54.192 48.153,51.885 51.238,48.801 51.238,45.021 48.136,45.021 45.037,41.922 v1(45.037,41.658) 45.037,38.814 v1(44.928,38.705) ; 53.835,53.475 53.835,54.175 53.885,54.225 53.885,54.425 v2(53.935,54.475) ; v2(66.915,50.275) 67.115,49.775 66.518,45.021 v1(68.215,43.323)
  In5.Cu w0.15: v2(53.935,54.475) 54.835,53.575 56.235,53.575 56.285,53.525 56.385,53.525 56.535,53.375 61.235,53.375 61.285,53.325 61.385,53.325 62.035,52.675 64.335,52.675 64.385,52.725 64.485,52.725 64.535,52.775 65.235,52.775 65.285,52.825 65.385,52.825 65.685,53.125 v2(66.085,53.125)
  B.Cu w0.15: v2(66.085,53.125) 66.085,53.075 TP_EOL.13@66.635,52.525 ; v2(66.915,50.275) TP_EOL.13@67.165,52.025
I2C2_SDA_U1: R16.1 U1.53 | length 19.4
  F.Cu w0.15: R16.1@46.26,38.525 46.762,38.525 46.762,38.361 v1(47.762,37.361) ; 47.285,37.825 48.685,37.825 48.885,38.025 49.285,38.025 49.485,38.225 50.285,38.225 50.385,38.325 50.885,38.325 v2(50.985,38.425) ; v2(60.185,40.525) 60.685,40.025 U1.53@62.985,40.025
  In3.Cu w0.15: v2(53.985,39.625) 54.885,40.525 57.885,40.525 58.085,40.725 58.185,40.725 58.285,40.825 59.885,40.825 v2(60.185,40.525)
  B.Cu w0.15: v2(50.985,38.425) 51.485,38.925 51.685,38.925 52.285,39.525 52.385,39.525 52.485,39.625 v2(53.985,39.625)
LORA_BUSY: R66.1 U1.56 U10.14 | length 44.6
  F.Cu w0.15: U1.56@63.435,41.525 64.312,41.525 64.312,41.844 v1(64.494,42.027) ; v1(69.304,25.453) 69.335,25.485 U10.14@70.235,25.485 ; R66.1@86.11,21.275 v1(86.11,22.699)
  In3.Cu w0.15: 62.585,42.025 62.585,42.325 63.185,42.925 63.285,42.925 63.385,43.025 63.485,43.025 63.585,42.925 63.685,42.925 v1@64.485,42.125 ; 62.62,42.027 61.838,41.245 61.838,40.534 63.514,38.859 63.514,32.639 69.304,26.849 v1(69.304,25.453)
  B.Cu w0.15: v1(69.304,25.453) 83.356,25.453 v1(86.11,22.699)
LORA_DIO1: R65.1 U1.17 U10.13 | length 39.9
  F.Cu w0.15: U1.17@48.385,43.025 48.585,43.025 48.985,42.625 49.185,42.625 49.285,42.525 49.385,42.525 49.585,42.325 49.585,41.125 v2(49.985,40.725) ; v2(63.885,27.625) v2(65.185,28.925) ; v2(68.735,26.755) U10.13@70.235,26.755
  In3.Cu w0.1: 50.435,37.575 50.535,37.475 50.535,35.875
  In3.Cu w0.15: v2(49.985,40.725) 49.985,38.325 50.085,38.225 50.085,38.125 50.185,38.025 50.185,37.925 50.285,37.825 50.285,37.725 50.385,37.625 ; 50.485,35.825 51.785,34.525 51.785,34.425 51.885,34.325 51.885,34.225 51.985,34.125 51.985,33.925 57.785,28.125 58.285,28.125 v2(58.385,28.025) ; v2(61.685,27.625) v2(63.885,27.625) ; v2(68.61,21.275) 68.71,22.075 68.01,23.275 68.11,23.675 68.51,24.175 68.41,24.575 67.91,25.075 67.81,25.575 v2(68.735,26.755)
  B.Cu w0.15: v2(58.385,28.025) 58.485,28.025 58.585,27.925 61.285,27.925 61.485,27.725 61.585,27.725 v2(61.685,27.625) ; v2(65.185,28.925) 65.485,29.225 65.785,29.225 66.085,28.925 66.085,28.825 66.185,28.725 66.185,28.025 v2(68.185,26.025)
LORA_MISO_U1: R72.2 U1.30 | length 25.1
  F.Cu w0.15: U1.30@51.685,37.275 51.685,36.398 54.114,33.97 v1(54.4,33.97) ; R72.2@68.61,22.525 v1(68.61,23.362)
  B.Cu w0.15: v1(54.4,33.97) 54.767,33.603 60.111,33.603 63.822,29.891 63.822,29.632 67.841,25.614 67.841,25.198 68.61,24.429 v1(68.61,23.362)
LORA_MISO_U10: R72.1 U10.16 | length 1.2
  F.Cu w0.15: R72.1@69.26,22.525 69.508,22.773 69.508,22.945 U10.16@70.235,22.945
LORA_MOSI_U1: R71.1 U1.31 | length 16.6
  F.Cu w0.15: R71.1@44.51,42.275 44.51,41.481 43.64,40.611 43.64,38.353 46.249,35.743 50.771,35.743 v1(51.056,36.028) ; U1.31@52.185,37.275 52.185,36.398 52.586,36.398 v1(52.937,36.048)
  B.Cu w0.15: v1(51.056,36.028) 51.075,36.048 v1(52.937,36.048)
LORA_MOSI_U10: R71.2 U10.17 | length 44.6
  F.Cu w0.15: R71.2@43.86,42.275 43.86,41.456 42.936,40.533 42.936,39.056 43.288,38.705 43.288,38.207 46.104,35.392 51.829,35.392 v1(53.593,33.628) ; v1(63.022,29.916) 63.561,30.455 v1(64.954,30.455) ; U10.17@70.235,21.675 72.265,23.705 v1(72.265,26.368)
  B.Cu w0.15: v1(53.593,33.628) 53.969,33.251 59.965,33.251 63.022,30.194 v1(63.022,29.916) ; v1(64.954,30.455) 65.823,29.586 68.763,29.586 71.981,26.368 v1(72.265,26.368)
LORA_NSS_U1: R69.1 U1.28 | length 24.3
  F.Cu w0.15: v2(40.885,43.525) 40.985,43.425 40.985,43.325 41.285,43.025 41.285,41.725 41.485,41.525 41.485,41.025 42.185,40.325 42.185,38.225 v2(42.385,38.025) ; R69.1@44.485,47.825 v2(44.485,48.225) ; v2(49.185,36.625) 49.485,36.325 50.385,36.325 50.685,36.625 U1.28@50.685,36.825
  In3.Cu w0.15: v2(40.885,43.525) 40.885,47.225 40.785,47.325 40.785,47.425 40.685,47.525 40.685,47.625 40.785,47.725 40.785,47.825 41.085,48.125 41.585,48.125 41.785,47.925 44.185,47.925 v2(44.485,48.225)
  B.Cu w0.15: v2(42.385,38.025) 45.185,38.025 45.385,37.825 45.685,37.825 46.685,36.825 46.785,36.825 46.885,36.725 49.085,36.725 v2(49.185,36.625)
LORA_NSS_U10: R68.2 R69.2 U10.19 | length 68.3
  F.Cu w0.15: R69.2@43.86,47.775 43.789,47.846 43.082,47.846 41.334,46.098 41.334,43.575 42.357,42.552 42.85,42.552 43.024,42.378 43.024,41.118 42.585,40.678 42.585,38.413 47.897,33.101 54.998,33.101 v1(55.498,32.601) ; v1(71.756,20.639) 71.739,20.639 U10.19@70.235,19.135 70.235,18.458 85.793,18.458 R68.2@86.11,18.775
  B.Cu w0.15: v1(55.498,32.601) 55.675,32.778 58.813,32.778 59.812,31.779 59.812,30.6 67.928,22.484 69.911,22.484 v1(71.756,20.639)
LORA_RESET_N: C68.1 R67.2 U1.57 U10.15 | length 49.5
  F.Cu w0.15: v2(60.085,41.925) 62.185,41.925 62.285,42.025 U1.57@62.985,42.025 ; R67.2@68.61,18.775 68.44,18.605 68.44,17.666 v1(68.938,17.168) ; C68.1@69.26,24.275 69.448,24.275 69.508,24.215 U10.15@70.235,24.215 70.962,24.215 v1(71.141,24.395) ; C68.1@69.285,24.325 69.385,24.325 69.485,24.425 69.585,24.425 69.685,24.525 69.885,24.525 69.985,24.625 70.085,24.625 70.185,24.725 70.785,24.725 70.985,24.925 70.985,27.125 71.685,27.825 71.685,27.925 71.785,28.025 71.685,28.125 71.685,28.325 71.385,28.625 v2(71.285,28.625)
  In3.Cu w0.15: v1(68.938,17.168) 69.818,18.047 69.818,23.071 v1(71.141,24.395)
  B.Cu w0.15: v2(60.085,41.925) 59.085,41.925 57.185,40.025 56.385,40.025 56.285,39.925 56.185,39.925 55.985,39.725 55.985,39.625 55.885,39.525 55.885,39.325 55.985,39.225 55.985,39.125 56.285,38.825 57.985,38.825 58.085,38.925 58.185,38.925 58.285,39.025 58.485,39.025 58.585,38.925 58.685,38.925 58.985,38.625 58.985,37.325 58.185,36.525 58.185,36.425 58.085,36.325 58.085,36.025 58.685,35.425 61.585,35.425 61.685,35.325 61.785,35.325 62.385,34.725 62.485,34.725 62.585,34.625 62.885,34.625 62.985,34.525 63.085,34.525 63.185,34.425 63.285,34.425 64.685,33.025 65.285,33.025 65.385,32.925 65.485,32.925 65.585,32.825 65.685,32.825 68.485,30.025 68.785,30.025 68.885,29.925 68.985,29.925 70.285,28.625 v2(71.285,28.625)
LORA_RF_ANT: C70.1 D5.1 J10.1 R73.2 | length 14.5
  F.Cu w0.151: 70.785,5.3 72.535,3.55 J10.1@76.66,3.55 ; R73.2@71.035,5.8 71.035,5.55 70.722,5.238 70.035,5.238 69.972,5.3 69.91,5.3 69.472,5.738 69.097,5.738 69.097,6.613 68.972,6.737 68.972,7.488 69.035,7.55 69.035,8.425 69.097,8.488 69.097,8.613 69.347,8.863 69.472,8.863 69.535,8.925 69.785,8.925 69.847,8.863 70.535,8.863 70.597,8.8 70.722,8.8 71.035,8.488 C70.1@71.035,8.3
LORA_RF_MODULE: C69.1 R73.1 U10.21 | length 9
  F.Cu w0.151: U10.21@70.222,12.3 70.785,12.3 71.722,11.363 71.722,11.238 71.785,11.175 71.785,8.863 72.285,8.363 72.285,8.238 71.847,8.238 71.348,7.738 70.847,7.738 70.347,7.238 70.347,7.05 R73.1@70.347,5.8
LORA_RXEN: R64.1 U1.55 U10.6 | length 45.1
  F.Cu w0.15: v1(62.373,41.029) 62.377,41.025 62.558,41.025 U1.55@63.435,41.025 ; v1(84.229,21.244) 84.408,21.423 84.408,21.675 U10.6@85.135,21.675 ; R64.1@86.11,20.025 86.11,19.498 86.96,19.498 v1(87.441,19.017)
  In3.Cu w0.15: v1(62.373,41.029) 66.155,37.247 66.155,30.672 69.861,26.966 69.861,24.061 v1(69.371,23.571) ; v1(84.229,21.244) 86.456,19.017 v1(87.441,19.017)
  B.Cu w0.15: v1(69.371,23.571) 81.903,23.571 v1(84.229,21.244)
LORA_SCK_U1: R70.1 U1.29 | length 30.4
  F.Cu w0.1: U1.29@51.185,37.725 v2(51.235,37.775) ; R70.1@66.885,47.875 67.185,48.175 67.235,48.175 67.285,48.225 67.735,48.225 67.785,48.175 67.835,48.175 68.435,47.575 v2(68.685,47.575)
  In5.Cu w0.1: v2(51.235,37.775) 53.135,37.775 53.235,37.875 55.135,37.875 55.185,37.925 58.485,37.925 58.535,37.975 58.635,37.975 59.085,38.425 59.285,38.425 59.335,38.475 59.385,38.475 59.435,38.525 59.485,38.525 60.785,39.825 60.985,39.825 61.035,39.875 61.135,39.875 61.185,39.925 61.235,39.925 61.585,40.275 62.435,40.275 62.485,40.325 62.585,40.325 62.635,40.375 62.685,40.375 63.385,41.075 66.685,41.075 66.735,41.125 66.785,41.125 67.785,42.125 68.585,42.125 68.635,42.175 68.685,42.175 68.735,42.225 68.785,42.225 69.135,42.575 70.585,42.575 70.685,42.675 70.735,42.675 70.935,42.875 71.085,42.875 71.135,42.925 71.185,42.925 71.285,43.025 71.285,43.075 71.335,43.125 71.335,43.275 71.535,43.475 71.535,43.525 71.635,43.625 71.635,43.975 71.535,44.075 71.535,44.125 68.685,46.975 v2(68.685,47.575)
LORA_SCK_U10: R70.2 U10.18 | length 32.5
  F.Cu w0.15: U10.18@70.235,20.405 73.379,23.549 73.379,25.986 ; v2(72.085,40.425) v2(72.085,42.825) ; 73.385,24.725 v2(73.385,34.825)
  In3.Cu w0.15: v2(67.585,47.725) 67.685,47.725 67.785,47.625 67.885,47.625 67.985,47.525 68.185,47.525 71.685,44.025 71.685,43.925 71.785,43.825 71.785,43.125 v2(72.085,42.825) ; v2(72.085,40.425) 72.085,39.225 72.185,39.125 72.185,37.525 72.285,37.425 72.285,37.325 72.385,37.225 72.385,37.025 72.485,36.925 72.485,36.825 72.585,36.725 72.585,36.625 72.685,36.525 72.685,36.425 72.785,36.325 72.785,36.225 72.885,36.125 72.885,35.925 72.985,35.825 72.985,35.725 73.085,35.625 73.085,35.525 73.185,35.425 73.185,35.325 73.285,35.225 73.285,35.125 73.385,35.025 v2(73.385,34.825)
LORA_TXEN: R63.1 U1.54 U10.7 | length 64
  F.Cu w0.15: v2(52.685,38.225) 53.085,38.225 53.785,38.925 53.885,38.925 54.585,39.625 54.585,40.125 54.685,40.225 54.685,40.325 54.885,40.525 55.185,40.525 v2(55.685,41.025) ; v2(60.285,41.125) 61.485,41.125 62.085,40.525 ; v1(60.911,40.576) 60.987,40.5 63.41,40.5 U1.54@63.435,40.525 ; v1(67.645,18.602) 67.645,18.689 68.454,19.498 69.26,19.498 R63.1@69.26,20.025 ; v1(72.129,19.457) 81.647,19.457 U10.7@85.135,22.945
  In3.Cu w0.15: v2(55.685,41.025) 57.885,41.025 57.985,41.125 58.085,41.125 58.185,41.225 60.185,41.225 v2(60.285,41.125) ; v2(56.785,28.025) 57.285,28.025 57.485,27.825 57.585,27.825 57.685,27.725 57.885,27.725 v2(58.085,27.525)
  B.Cu w0.15: v2(52.685,38.225) 53.485,37.425 53.485,35.425 53.385,35.325 53.385,34.825 52.785,34.225 52.785,34.125 52.685,34.025 52.685,33.925 52.585,33.825 52.585,33.425 52.685,33.325 52.685,33.225 52.785,33.125 52.785,33.025 56.785,29.025 v2(56.785,28.025) ; v2(58.085,27.525) 59.085,26.525 60.185,26.525 61.085,25.625 61.285,25.625 65.785,21.125 68.185,21.125 v2(69.185,20.125) ; v1(67.645,18.602) 68.5,19.457 v1(72.129,19.457)
LSE_IN: U1.8 X1.2 | length 19.9
  F.Cu w0.15: U1.8@48.385,47.525 v2(48.435,47.525) ; v2(65.935,44.525) X1.2@65.935,44.725
  In5.Cu w0.15: v2(48.435,47.525) 54.835,47.525 55.085,47.275 55.185,47.275 55.235,47.225 60.685,47.225 60.735,47.175 60.785,47.175 60.835,47.125 60.935,47.125 60.985,47.075 61.035,47.075 61.085,47.025 61.135,47.025 61.185,46.975 61.235,46.975 64.435,43.775 64.585,43.775 64.635,43.725 64.685,43.725 64.735,43.775 65.535,43.775 65.585,43.825 65.635,43.825 65.885,44.075 65.885,44.125 65.935,44.175 v2(65.935,44.525)
MIC_WAKE: R23.1 U1.67 U18.4 | length 31.9
  F.Cu w0.15: R23.1@57.51,27.275 57.51,27.901 57.313,28.098 57.313,28.525 U18.4@57.925,28.525 58.537,28.525 v1(58.717,28.525) ; v1(60.515,42.731) 62.558,44.774 62.558,47.025 U1.67@63.435,47.025
  In3.Cu w0.15: v1(58.717,28.525) 57.946,28.525 52.399,34.072 52.399,37.25 53.212,38.063 53.212,39.753 56.191,42.731 v1(60.515,42.731)
MIC_WAKE1: J_MIC1.5 R19.1 U17.1 U19.4 | length 48.3
  F.Cu w0.15: J_MIC1.5@10.275,30.275 11.052,30.275 11.86,31.083 ; U19.4@12.017,36.025 11.458,36.025 11.458,34.954 11.86,34.552 R19.1@11.86,32.525 11.86,31.998 11.86,31.083 ; U17.1@47.785,30.975 46.647,30.975 44.241,33.381 35.942,33.381 35.691,33.131 27.785,33.131 27.607,33.31 27.607,33.491 25.485,35.612 20.13,35.612 16.392,31.874 16.392,31.171 15.996,30.775 12.168,30.775 11.86,31.083
MIC_WAKE2: J_MIC2.5 R20.1 U17.2 U20.4 | length 42.7
  F.Cu w0.112: v1@40.959,12.44 40.959,12.508 40.977,12.525 U20.4@41.517,12.525
  F.Cu w0.15: v1(40.779,12.44) v1@40.959,12.44 ; v1(41.61,10.284) R20.1@41.61,9.525 41.61,8.998 41.682,8.998 43.287,7.392 45.935,7.392 J_MIC2.5@45.935,6.615 ; v1(46.554,30.325) U17.2@47.785,30.325
  In3.Cu w0.15: v1(40.779,12.44) 41.61,11.608 v1(41.61,10.284) 40.196,8.87 40.196,7.076 40.518,6.753 41.844,6.753 45.672,10.581 45.672,29.443 v1(46.554,30.325)
MIC_WAKE3: J_MIC3.5 R21.1 U17.4 U21.4 | length 77.7
  F.Cu w0.112: 94.431,8.399 94.708,8.399
  F.Cu w0.15: U17.4@47.785,29.025 v1(49.024,29.025) ; v1(86.603,10.497) 91.635,10.497 92.358,9.775 R21.1@92.86,9.775 92.86,8.965 93.426,8.399 94.431,8.399 ; U21.4@95.267,9.275 94.708,9.275 94.708,8.399 94.818,8.399 95.514,7.704 95.514,6.291 95.967,5.838 97.935,5.838 J_MIC3.5@97.935,6.615
  In3.Cu w0.15: v1(49.024,29.025) 49.573,28.477 49.573,17.384 52.815,14.142 52.815,11.554 61.574,2.795 78.901,2.795 v1(86.603,10.497)
MIC_WAKE4: J_MIC4.5 R22.1 U17.5 U22.4 | length 75.8
  F.Cu w0.15: U17.5@47.785,28.375 48.812,28.375 48.901,28.285 v1(50.534,28.285) ; v1(101.779,22.036) 101.779,21.778 103.032,20.525 U22.4@104.017,20.525 ; R22.1@103.36,23.275 103.36,23.802 103.549,23.802 v1(103.737,23.991) 105.602,23.991 106.318,23.275 J_MIC4.5@107.095,23.275
  In3.Cu w0.15: v1(50.534,28.285) 52.38,26.439 55.101,26.439 62.891,18.649 62.891,16.512 66.412,12.991 92.736,12.991 v1(101.779,22.036) ; v1(101.779,22.036) v1(101.779,22.036) ; v1(103.737,23.991) v1(101.779,22.036) v1(101.779,22.036)
MIC_WAKE12_OR_1V8: U17.3 U17.9 | length 6.7
  F.Cu w0.15: U17.3@47.785,29.675 50.631,29.675 v1(51.563,28.743) ; v1(52.362,28.053) 52.558,27.858 52.558,27.725 U17.9@53.585,27.725
  B.Cu w0.15: v1(51.563,28.743) 52.253,28.053 v1(52.362,28.053)
MIC_WAKE34_OR_1V8: U17.6 U17.10 | length 6.2
  F.Cu w0.15: U17.6@47.785,27.725 51.29,27.725 52.146,28.581 52.582,28.581 52.789,28.375 U17.10@53.585,28.375
MIC_WAKE_OR_1V8: U17.8 U18.3 | length 3.5
  F.Cu w0.112: U17.8@53.585,27.075 54.699,27.075 55.635,28.011
  F.Cu w0.15: 55.635,28.011 55.931,28.011 U18.3@56.445,28.525
NOR_CLK_U1: R8.1 U1.38 | length 24.2
  F.Cu w0.15: U1.38@55.685,37.275 56.135,41.175 56.585,41.625 57.985,49.325 v1(59.185,50.525) ; R8.1@57.91,59.05 56.66,57.8 56.66,57.05 57.335,56.775 57.485,56.675 v1(58.485,55.275)
  In3.Cu w0.15: v1@58.385,55.225 58.485,55.125 58.485,54.925 58.585,54.825 58.585,54.725 58.685,54.625 58.685,54.525 58.785,54.425 58.785,54.325 58.885,54.225 58.885,54.125 58.985,54.025 58.985,53.825 59.085,53.725 59.085,53.625 59.185,53.525 v1@59.185,50.625
NOR_CLK_U2: R8.2 U2.16 | length 30.5
  F.Cu w0.15: R8.2@58.51,59.025 v1(61.885,55.875) ; v1(82.785,47.925) 84.285,47.925 84.29,47.925 U2.16@84.335,47.97
  B.Cu w0.15: v1(61.885,55.875) 67.035,55.325 73.285,53.025 73.635,52.675 74.185,51.525 74.535,51.075 81.757,48.317 81.529,47.72 82.09,47.506 82.318,48.103 v1(82.785,47.925)
NOR_IO0_U1: R9.1 U1.40 | length 30.8
  F.Cu w0.15: U1.40@56.685,37.275 56.735,38.025 57.268,39.953 56.603,40.137 56.763,40.715 57.428,40.531 57.588,41.109 56.922,41.293 57.082,41.872 57.747,41.688 57.907,42.266 57.242,42.45 57.402,43.028 58.067,42.844 58.227,43.423 57.562,43.606 57.722,44.185 58.387,44.001 58.547,44.579 57.882,44.763 58.041,45.341 58.707,45.158 58.866,45.736 58.201,45.92 58.361,46.498 59.026,46.314 v1(60.135,50.325) ; v1(64.185,54.075) R9.1@64.185,54.95
  B.Cu w0.15: v1(60.135,50.325) 61.735,49.875 61.985,49.925 62.235,50.175 62.509,50.593 63.136,50.182 63.465,50.684 62.838,51.095 63.185,51.625 v1(64.185,54.075)
NOR_IO0_U2: R9.2 U2.15 | length 23.8
  F.Cu w0.15: R9.2@64.185,55.6 v1(65.035,56.075) ; v1(78.785,50.925) 82.41,47.3 83.66,47.3 84.285,46.675 84.31,46.7 U2.15@84.335,46.7
  B.Cu w0.15: v1(65.035,56.075) 74.635,54.225 76.185,52.675 76.835,51.325 77.185,51.025 77.635,50.875 v1(78.785,50.925)
NOR_IO1_U1: R10.1 U1.41 | length 21.7
  F.Cu w0.15: U1.41@57.185,37.275 57.235,38.025 59.835,47.725 v1(61.485,49.375) ; v1(65.535,53.975) R10.1@65.685,54.95
  B.Cu w0.15: v1(61.485,49.375) 64.835,50.075 65.035,50.325 65.785,51.825 v1(65.535,53.975)
NOR_IO1_U2: R10.2 U2.8 | length 32.9
  F.Cu w0.15: R10.2@65.685,55.6 66.135,56.075 67.535,56.125 v1(70.035,53.625) ; U2.8@75.035,39.08 v1(75.035,39.225)
  B.Cu w0.15: v1(70.035,53.625) 71.685,51.425 74.035,49.075 74.681,42.707 76.539,42.896 76.599,42.299 74.742,42.11 74.803,41.513 76.66,41.702 76.72,41.105 74.863,40.916 74.924,40.319 76.781,40.508 76.842,39.911 74.984,39.722 v1(75.035,39.225)
NOR_IO2_U1: R11.1 U1.42 | length 23.6
  F.Cu w0.15: U1.42@57.685,37.275 57.885,38.925 58.885,39.975 v1(62.085,48.525) ; v1(67.185,54.075) R11.1@67.185,54.95
  B.Cu w0.15: v1(62.085,48.525) 66.785,49.275 67.035,49.575 68.285,51.675 68.335,52.875 v1(67.185,54.075)